# Altium PCB PCB1.PcbDoc
Units mm, origin at the board's own origin, x right, y up, seen from the top; angles counter-clockwise.
Board outline 41 x 17 mm, 2 copper layers (Top Layer, Bottom Layer); 5 components, 3 nets, 17 pads, 4 vias.
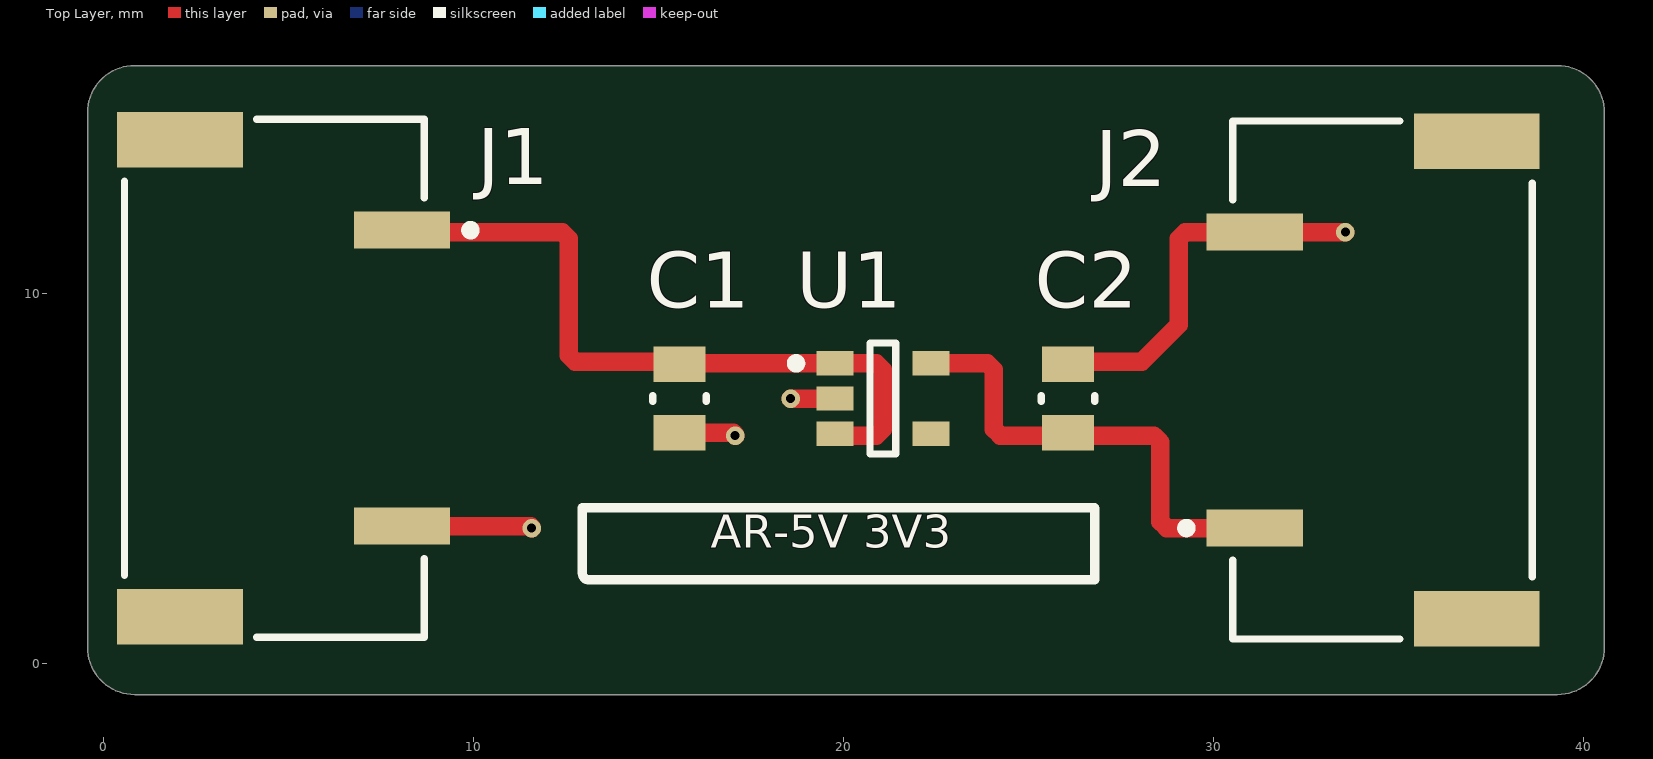
[diagram p0: Top Layer view]
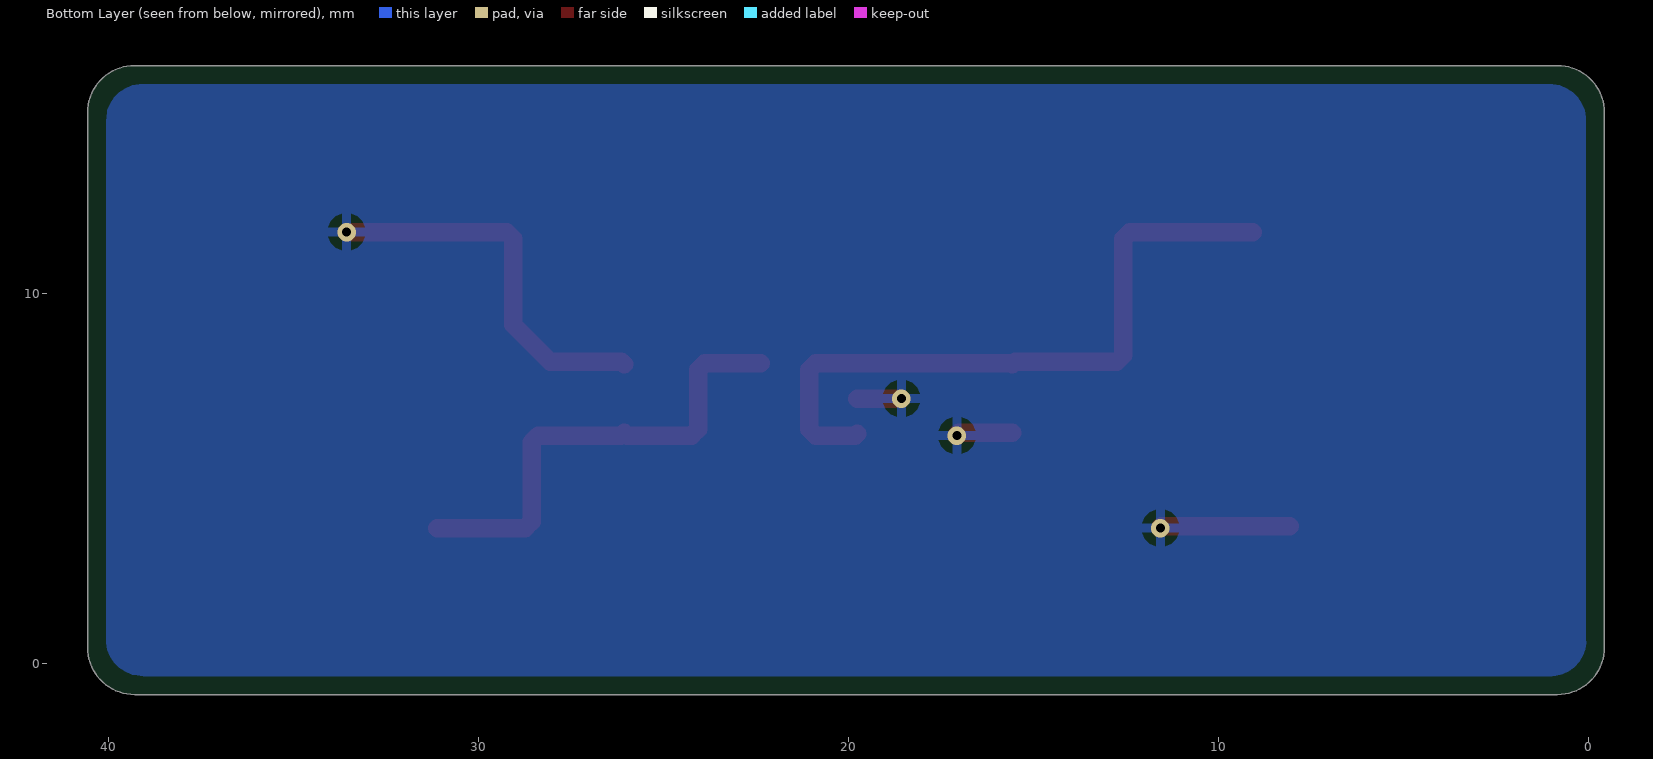
[diagram p1: Bottom Layer view, seen from below]
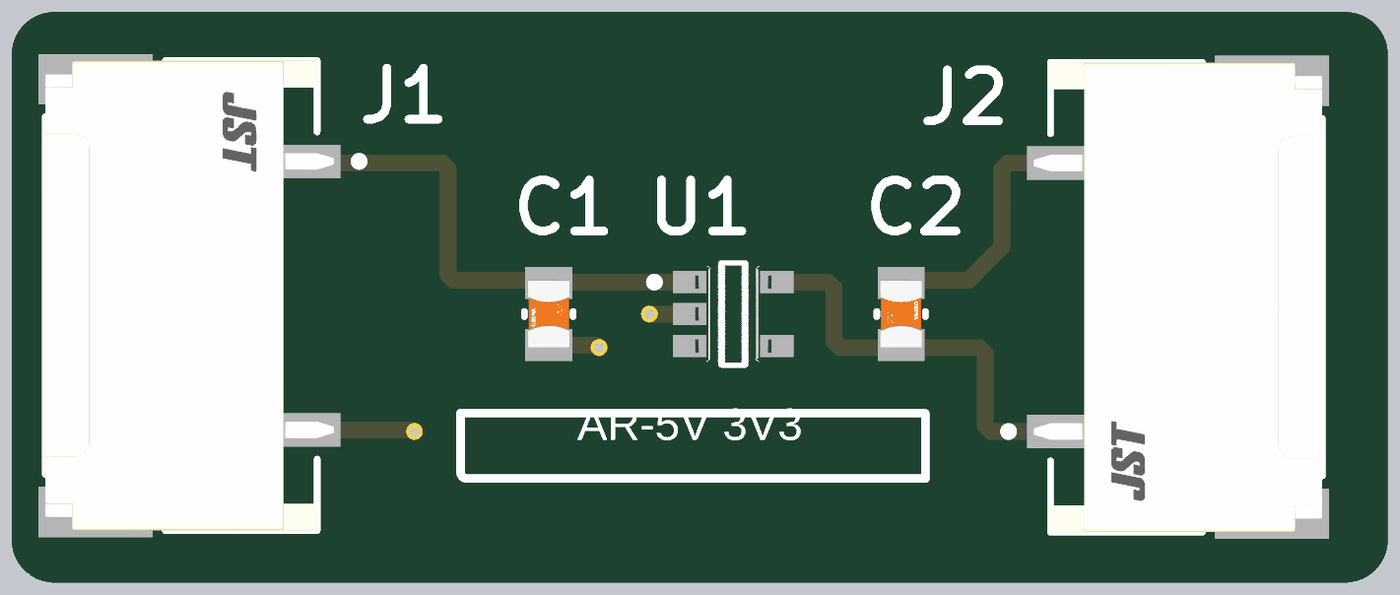
[diagram p2: 3D render of the assembled board from above, using the file's embedded part models]

## Layer stack, top to bottom
Top Solder: solder mask 0.0102, Solder Resist, Dk 3.5
Top Layer: signal copper 0.0356
Dielectric 1: dielectric 0.32, FR-4, Dk 4.8
Bottom Layer: signal copper 0.0356
Bottom Solder: solder mask 0.0102, Solder Resist, Dk 3.5

## Board outline
-0.425,0.42 -0.425,14.88 cw(c0.845,14.88) 0.845,16.15 39.305,16.15 cw(c39.305,14.88) 40.575,14.88 40.575,0.42 cw(c39.305,0.42) 39.305,-0.85 0.845,-0.85 cw(c0.845,0.42)

## Design rules (kind name [scope] priority, off if disabled: settings)
Clearance [All] p1: gap=0.254 ignorepadtopadclearanceinfootprint=FALSE
PolygonConnect [All] p1: connectstyle=Relief reliefconductorwidth=0.254 reliefentries=4 polygonreliefangle="90 Angle" airgapwidth=0.254
RoutingVias [All] p1: holewidth=0.711 width=1.27 viastyle="Through Hole" minholewidth=0.711 minwidth=1.27 maxholewidth=0.711 maxwidth=1.27
SolderMaskExpansion [All] p1: expansion=0 istentingtop=FALSE
SupplyNets "Schematic Supply Nets_2" [InNet('+3V3')] p1: voltage=0.000
SupplyNets "Schematic Supply Nets_1" [InNet('+5')] p2: voltage=0.000
SupplyNets "Schematic Supply Nets" [InNet('GND')] p3: voltage=0.000
Width [All] p1: maxlimit=0.5 minlimit=0.254 preferedwidth=0.3
30 further rules are at their usual default settings.

## Components (designator, comment, footprint, x,y, rotation, side; value= is the part's Value field where it differs from the comment)
C1 "1u" FP-CC0805-0_85-MFG 15.575,7.15 r270 top value="1 uF"
C2 "1u" FP-CC0805-0_85-MFG 26.075,7.15 r90 top value="1 uF"
J1 "SM02(8.0)B-BHS-1-TB(LF)(SN)" FP-SM02_8_0_B-BHS-1-TB_LF-MFG 4.625,7.7 r270 top
J2 "SM02(8.0)B-BHS-1-TB(LF)(SN)" FP-SM02_8_0_B-BHS-1-TB_LF-MFG 34.575,7.65 r90 top
U1 "MIC5317-3.3YM5-TR" FP-SOT23-5LD-PL-1-MFG 21.075,7.15 r0 top

## Footprints (in the part's own frame and the unit in brackets; to place one, negate y for a bottom-side part, rotate by r counter-clockwise, add the part's x,y. Pads: shape width x height; smd on the part's side, far side on the other; paste and mask are expansions set on the pad)
FP-CC0805-0_85-MFG [mm]
  rect 0.95x1.4 smd paste+0 mask+0: 1(-0.925,0) 2(0.925,0)
  silkscreen extent -0.08,-0.72 0.08,0.72, body extent -1.6,-1.05 1.6,1.05, height 0.25
FP-SM02_8_0_B-BHS-1-TB_LF-MFG [mm]
  rect 1x2.6 smd paste+0 mask+0: 1(-4,3.45) 2(4,3.45)
  rect 1.5x3.4 smd paste+0 mask+0: 3(-6.45,-2.55) 4(6.45,-2.55)
  silkscreen extent -7,-4.05 7,5.43, body extent -7.3,-4.35 7.3,4.85, height 0.25
FP-SOT23-5LD-PL-1-MFG [mm]
  rect 1x0.66 smd paste+0 mask+0: 1(-1.3,0.95) 2(-1.3,0) 3(-1.3,-0.95) 4(1.3,-0.95) 5(1.3,0.95)
  silkscreen extent -2.47,-1.5 0.35,1.5, body extent -1.9,-1.6 1.9,1.6, height 0.25

## Part data
C1 C2: library part CMP-03422-000182-1, "CAP CER 1UF 10V X7R 0805", Capacitance="1 uF", Manufacturer=Yageo, Manufacturer Part Number=CC0805KKX7R6BB105, Package=CC0805-0.85, Temperature="-30°C to +85°C", Temperature Characteristic=X7R, Temperature Range High=+85°C, Temperature Range Low=-30°C, Tolerance=0.1, Voltage Rating="10 V", Automotive=No, Category=Cap, ComponentLink2Description=Datasheet, ComponentLink2URL=http://www.yageo.com/documents/recent/UPY-GPHC_Y5V_6.3V-to-50V_8.pdf, Device Class L1="Passive Components", Device Class L2=Capacitors, Device Class L3="Ceramic Capacitors", Digikey Description="CAP CER 1UF 10V X7R 0805", Footprint Url=http://www.yageo.com/exep/pages/download/literatures/UPY-C_GEN_24.pdf, Height=0.95mm, Ipc Land Pattern Name=CAPC200125X85, Lead Free=Yes, Material=Ceramic, Mouser Description="Multilayer Ceramic Capacitors MLCC - SMD/SMT 1.0uF 10V X7R 10%", Octopart=https://octopart.com/cc0805kkx7r6bb105-yageo-42522859, RoHS=TRUE
J1 J2: library part CMP-17439-000157-1, "CONN HEADER SMD R/A 2POS 8MM", Color=Natural, Contact Resistance=20mR, Current Rating=1A, Flammability Rating="UL94 V-0", Housing Color=Beige, Max Operating Temperature=85°C, Max Voltage Rating (AC)=600V, Min Operating Temperature=-25°C, Package Quantity=1000, Connector Type=Header, Contact Finish - Mating=TIN, Contact Material="Copper Alloy", Contact Plating=Tin, Contact Shape=Square, Contact Type="Male Pin", Depth=8.6mm, Fastening Type=Detent, Housing Material=Polyamide, Insulation Color=Natural, Insulation Material=Nylon, Lead Free="Lead Free", Length=14mm, Max Current Rating=1A, Mount="Surface Mount", Number of Contacts=2, Number of Positions=2, Number of Rows=1, Orientation="Right Angle", Packaging="Tape and Reel", Pitch=8mm, Series=BH, Termination=Solder, Voltage Rating=600V
U1: library part CMP-06324-000116-1, "IC REG LINEAR 3.3V 150MA SOT23-5", Case/Package=SOT-23-5, Dropout Voltage=155mV, Max Input Voltage=6V, Max Operating Temperature=125°C, Min Current Limit=200mA, Min Input Voltage=2.5V, Min Operating Temperature=-40°C, Output Current=150mA, Output Voltage=3.3V, Package Quantity=3000, Power Supply Rejection Ratio (PSRR)=70dB, Mount="Surface Mount", Number of Outputs=1, Number of Regulators=1, Packaging="Tape and Reel", RoHS Compliant=No, Series=-

## Via types
v1: diameter 0.5, hole 0.25, Top Layer to Bottom Layer, 4 vias

## Nets (pads, with @x,y where several pads share a name; then routed paths per layer and width w, separated by ;. In a path a pad name is that pad's centre, name@x,y a point inside that pad or via, vN(x,y) a via of type N, cw(c..) or ccw(c..) an arc to the next point about the centre after c; other vN are vias at no path point)
+3V3: C2.1 J2.1 U1.5 | length 12.9
  Top Layer w0.5: U1.5 23.899,8.1 24.075,7.924 24.075,6.326 24.251,6.15 26,6.15 C2.1 26.15,6.15 28.399,6.15 28.575,5.974 28.575,3.826 28.751,3.65 J2.1
+5: C1.1 J1.1 U1.1 U1.3 | length 18.4
  Top Layer w0.5: J1.1@9.075,11.65 12.399,11.65 12.575,11.474 12.575,8.326 12.751,8.15 15.5,8.15 C1.1 15.6,8.1 U1.1 20.899,8.1 21.075,7.924 21.075,6.326 20.899,6.15 19.825,6.15 U1.3
GND: C1.2 C2.2 J1.2 J2.2 U1.2 | length 16.6
  Top Layer w0.5: J1.2 11.525,3.7 cw(c11.525,3.65) v1(11.575,3.65) ; C1.2 17,6.225 cw(c17,6.15) v1(17.075,6.15) ; v1(18.575,7.15) U1.2 ; C2.2 26.15,8.15 28.075,8.15 29.075,9.15 29.075,11.474 29.251,11.65 J2.2 v1(33.575,11.65)
pads on no net: J1.3 J1.4 J2.3 J2.4 U1.4

## Polygon pours and split planes (outlines as drawn)
GND on Bottom Layer "GND_L02_P000" (solid, pour order 0): 0.075,0.65 0.075,14.65 cw(c1.075,14.65) 1.075,15.65 39.075,15.65 cw(c39.075,14.65) 40.075,14.65 40.075,0.65 cw(c39.075,0.65) 39.075,-0.35 0.992,-0.35 cw(c1.033,0.608)

## Silkscreen, mask and mechanical layers (free items; w line width, h text height)
Top Overlay:
  lines w0.254: 12.95,2.425 ccw(c13.125,2.425) 13.125,2.25 26.8,2.25 26.8,4.175 ccw(c26.775,4.175) 26.775,4.2 12.95,4.2 12.95,2.425
  text "AR-5V 3V3" at 16.425,2.82 h1.52
Mechanical 1:
  the board outline again, w0.254